# Altium PCB VHF_AMP.PCBDOC (part 7 of 7)
Units mm, origin at the board's own origin, x right, y up, seen from the top; angles counter-clockwise.
Board outline 222.47 x 100.01 mm, 4 copper layers (Top Layer, Int1 (GND), Int2 (PWR), Bottom Layer), stack 1.508 mm thick; 513 components, 284 nets, 1695 pads, 984 vias.
Unrouted connection lines stored in the file: 110.
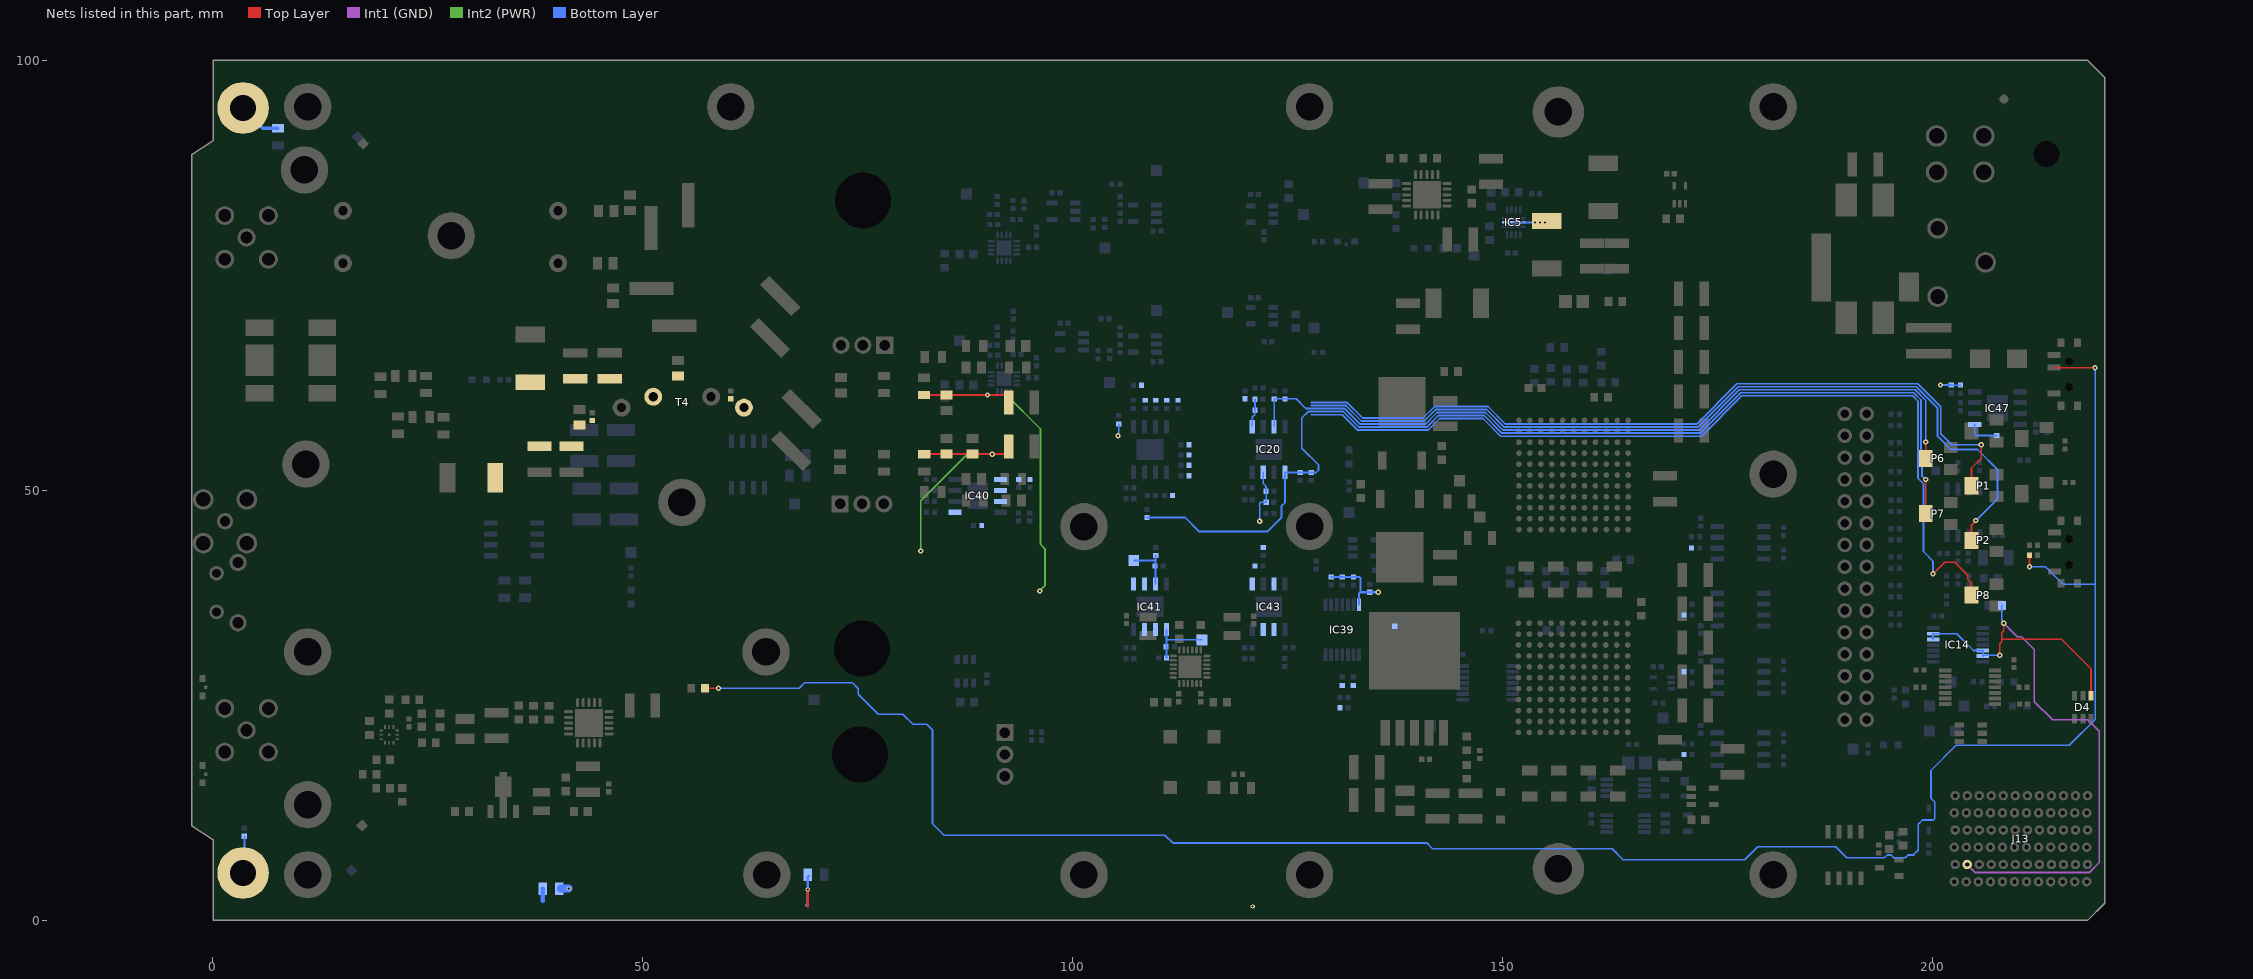
[diagram p7: the nets of this part, all layers, seen from the top]

## Via types
v1: diameter 0.6, hole 0.25, Top Layer to Bottom Layer, tented both sides, 878 vias
v2: diameter 0.6, hole 0.25, Top Layer to Bottom Layer, tented top, 61 vias
v3: diameter 0.5, hole 0.25, Top Layer to Bottom Layer, tented top, 27 vias
v4: diameter 1, hole 0.5, Top Layer to Bottom Layer, tented both sides, 16 vias
v5: diameter 0.5, hole 0.25, Top Layer to Bottom Layer, tented both sides, 2 vias

## Nets (pads, with @x,y where several pads share a name; then routed paths per layer and width w, separated by ;. In a path a pad name is that pad's centre, name@x,y a point inside that pad or via, vN(x,y) a via of type N, cw(c..) or ccw(c..) an arc to the next point about the centre after c; other vN are vias at no path point) (continued)
SERVMOD_3V3: D4.4 IC14.5 IC14.6 IC14.12 IC14.13 J13.K2 R85.2 | length 82.3
  Top Layer w0.2: v1(207.85,30.815) 207.85,32.149 208.1,32.399 208.1,32.678 ; v1(208.316,34.54) 208.316,33.663 208.1,33.447 208.1,32.678 ; D4.4@218.463,26.123 218.463,29.254 215.039,32.678 208.1,32.678
  Int1 (GND) w0.2: J13.K2@204.066,6.493 205.009,5.55 218.254,5.55 219.429,6.725 219.429,21.964 218.086,23.307 214.001,23.307 211.878,25.43 211.878,31.482 210.387,32.972 209.884,32.972 v1(208.316,34.54)
  Bottom Layer w0.2: IC14.12@200.095,32.67 200.187,32.67 200.095,32.762 IC14.13@200.095,33.32 202.854,33.32 204.804,31.37 IC14.5@205.895,31.37 IC14.6@205.895,30.815 ; IC14.6@205.895,30.72 205.99,30.815 v1(207.85,30.815) ; R85.2@208.12,36.603 208.1,36.583 208.1,34.864 208.316,34.648 v1(208.316,34.54)
SPI_MISO: R16.1
SPI_NCS1: R39.1
SPI_NCS2: R169.1
SPI_SCK: R37.1
STRIP1: C82.1 M1.1 M2.1 R25.1 R47.2 | length 8.3
  Bottom Layer w0.2: M2.1@3.75,5.65 C82.1@3.75,9.756
  Bottom Layer w0.4: M2.1@3.6,5.5 M2.1@3.75,5.65 ; M1.1@5.351,92.651 5.903,92.099 R25.1@7.65,92.099
  Bottom Layer w0.5: 38.45,2.25 R47.2@38.45,3.65 R47.2@38.45,3.7
STRIP2: R29.1 | length 5.4
  Top Layer w0.3: 69.25,1.634 v3(69.25,3.589)
  Bottom Layer w0.3: 69.107,1.769 69.25,1.912 v3(69.25,3.589) 69.25,5.05 R29.1@69.35,5.15
STRIP3: R47.1 | length 0.9
  Bottom Layer w0.9: R47.1@40.539,3.705 v5(41.459,3.705)
  other v5: 120.987,1.596
Sw_7V5: IC5.2 L9.1 | length 3.6
  Bottom Layer w0.2: IC5.2@151.33,81.147 v1(153.8,81.147) v1(154.41,81.147) v1(154.97,81.147)
SW_OFF: R1.1 R114.1 | length 246.3
  Top Layer w0.2: R114.1@57.31,26.981 v1(58.86,26.981) ; v2(211.323,41.118) R1.1@211.323,42.457 ; 214.183,64.252 v1(218.932,64.252)
  Bottom Layer w0.2: v1(58.86,26.981) 68.246,26.981 68.875,27.61 74.458,27.61 75.135,26.932 75.135,26.295 77.459,23.971 80.319,23.971 81.49,22.8 83.099,22.8 83.747,22.152 83.747,11.253 85.1,9.9 110.778,9.9 111.678,9 141.212,9 141.903,8.309 162.793,8.309 164.051,7.05 178.21,7.05 179.71,8.55 188.774,8.55 190.044,7.28 194.452,7.28 194.772,7.6 195.228,7.6 195.548,7.28 196.873,7.28 197.193,7.6 197.812,7.6 198.38,8.168 198.38,11.165 198.876,11.661 200.135,11.661 200.28,11.806 200.28,13.754 199.855,14.179 199.855,17.422 202.773,20.34 215.937,20.34 218.945,23.348 218.945,39.083 ; v2(211.323,41.118) 213.166,41.118 215.2,39.083 218.945,39.083 ; v1@218.945,64.252 218.945,39.083
Vbal_N: IC20.5 P7.2 R90.2 R190.2 R192.1 | length 123.5
  Top Layer w0.2: P7.2@199.25,47.3 199.252,47.302 v2(199.252,51.26)
  Bottom Layer w0.2: R90.2@108.7,46.83 113.128,46.83 114.758,45.2 122.7,45.2 124.327,46.827 124.327,48.138 124.75,48.56 IC20.5@124.75,52.105 124.785,52.07 R192.1@126.5,52.07 128.355,52.07 128.65,52.366 128.65,52.934 126.687,54.897 126.687,58.4 127.437,59.15 131.552,59.15 133.352,57.35 141.226,57.35 142.571,58.695 147.91,58.695 149.955,56.65 173.045,56.65 177.726,61.331 197.864,61.331 198.7,60.495 198.7,54.626 198.8,54.526 198.8,51.712 v2(199.252,51.26)
Vbal_P: IC20.3 P6.2 R81.2 R189.2 R191.1 | length 92.2
  Top Layer w0.2: P6.2@199.25,53.7 v2(199.25,55.621)
  Bottom Layer w0.2: v2(105.338,56.35) 105.4,56.412 R81.2@105.4,57.73 ; IC20.3@123.48,57.405 R191.1@123.48,60.63 R189.2@124.75,60.63 126.06,60.63 127.19,59.5 131.697,59.5 133.497,57.7 141.081,57.7 142.426,59.045 148.055,59.045 150.1,57 172.9,57 177.581,61.681 198.008,61.681 199.25,60.44 v2(199.25,55.621)
Vbalance_buf: IC41.6 IC41.7 R196.2 R202.2
Vbalance_inv: IC43.1 R203.1 R207.2
VBIAS_balance: IC41.5 P2.2 R209.2 R212.1 TP29.1 | length 106.7
  Top Layer w0.2: P2.2@204.562,44.17 204.562,45.966 204.58,45.983 v2(205.07,46.474)
  Bottom Layer w0.2: IC41.5@110.95,33.805 110.97,33.785 110.97,32.618 ; R212.1@110.97,30.5 110.97,32.618 ; TP29.1@115.1,32.618 110.97,32.618 ; 127.794,59.85 131.842,59.85 133.642,58.05 140.936,58.05 142.281,59.395 148.2,59.395 150.245,57.35 172.755,57.35 177.436,62.031 198.153,62.031 200.626,59.559 200.626,56.278 202.165,54.739 205.257,54.739 207.6,52.396 207.6,49.004 v2(205.07,46.474)
VBIAS_master: IC41.3 P1.2 R200.2 R204.1 TP27.1 | length 97.9
  Top Layer w0.2: P1.2@204.562,50.531 204.562,52.592 205.7,53.73 v2(205.7,55.289)
  Bottom Layer w0.2: TP27.1@107.155,41.841 109.68,41.841 ; IC41.3@109.68,39.105 109.68,41.841 ; R204.1@109.68,42.43 109.68,41.841 ; 127.794,60.2 131.987,60.2 133.787,58.4 140.791,58.4 142.136,59.745 148.345,59.745 150.39,57.7 172.61,57.7 177.292,62.381 198.298,62.381 200.976,59.704 200.976,56.564 202.251,55.289 v2(205.7,55.289)
Vbias_N: C41.2 C83.2 C84.2 C85.2 IC20.7 R21.1 R60.1 | length 33.5
  Top Layer w0.245: R21.1@82.8,54.2 C84.2@88.4,54.2 v1(90.7,54.2) 92.37,54.2 92.6,54.43 C85.2@92.6,55.1
  Int2 (PWR) w0.2: v1(82.389,42.93) 82.389,48.789 87.8,54.2 v1(90.7,54.2)
  Bottom Layer w0.2: v2(121.8,46.4) 121.8,48.483 121.917,48.6 C41.2@122.55,48.6 122.55,49.88 R60.1@122.53,49.9 122.53,50.476 122.21,50.797 IC20.7@122.21,52.105
Vbias_P: C40.2 C43.2 C44.2 C45.2 IC20.1 R14.1 R26.1 | length 41
  Top Layer w0.245: R14.1@82.76,61.096 C43.2@85.36,61.096 90.156,61.096 v1(90.16,61.1) 92.37,61.1 92.6,60.87 C45.2@92.6,60.2
  Int2 (PWR) w0.2: v1(90.16,61.1) 92.336,61.1 96.309,57.128 96.309,43.716 96.83,43.195 96.83,38.9 v1(96.23,38.3)
  Bottom Layer w0.2: IC20.1@120.94,57.405 120.94,58.49 121.23,58.78 R26.1@121.23,59.3 121.25,59.32 C40.2@121.25,60.6
VCC: C3.2 C7.2 IC39.14 R40.2 R41.1 R48.1 R91.2 R105.1 | length 8.7
  Bottom Layer w0.25: R40.2@130.107,39.915 R41.1@131.4,39.915 133.366,39.915 133.513,39.769 133.513,38.149 ; IC39.14@133.357,36.705 133.357,37.994 133.513,38.15 ; v2(135.584,38.15) C7.2@134.6,38.15 133.513,38.15
Vcmp_off: IC40.7 R185.1
Vcur_sum: IC40.1 IC40.6 R75.1
VDD_PA_N: C31.2 C46.2 C47.2 C48.2 L3.2 T4.2
VDD_PA_P: C50.2 C66.2 C70.2 C145.2 L2.2 T4.3
Vmaster_buf: IC41.1 IC41.2 R198.2 R208.2
VrefI2I: C51.2 IC43.3 IC43.6 IC43.7 R89.1 R194.2 R199.2 R205.2 R211.2 | length 2.3
  Bottom Layer w0.2: v2(200.973,62.25) C51.2@202.2,62.25 202.228,62.222 R89.1@203.297,62.222
Vtemperature_pull: IC47.1 R88.1 R94.2 R96.2 | length 3.8
  Bottom Layer w0.2: IC47.1@204.951,57.654 204.951,56.489 205.07,56.37 R88.1@207.514,56.37
Vtrh_off: IC40.5 P8.2 R193.2 R197.1 | length 103.4
  Top Layer w0.2: v2(200.095,40.3) 200.124,40.3 201.458,41.633 202.627,41.633 204.137,40.123 204.137,39.659 204.562,39.234 P8.2@204.562,37.81
  Bottom Layer w0.2: 127.794,58.8 131.407,58.8 133.207,57 141.371,57 142.716,58.345 147.765,58.345 149.81,56.3 173.19,56.3 177.871,60.981 197.719,60.981 198.339,60.361 198.339,51.395 198.979,50.755 198.979,42.881 200.095,41.765 v2(200.095,40.3)
pads on no net: B15.1 B18.1 B19.1 FTG1.FTG2 FTG2.1 FTG3.1 FTG4.1 FTG5.1 FTG6.1 IC1.1 IC6.4 IC6.5 IC6.8 IC6.9 IC6.11 IC6.12 IC7.9 IC7.22 IC9_VHF_FWD_RFD.2 IC9_VHF_FWD_RFD.6 IC9_VHF_FWD_RFD.8 IC9_VHF_FWD_RFD.13 IC9_VHF_REV_RFD.2 IC9_VHF_REV_RFD.6 IC9_VHF_REV_RFD.8 IC9_VHF_REV_RFD.13 IC16.5 IC21.G1 IC21.K2 IC21.L2 IC21.L3 IC22.G1 IC22.K2 IC22.L2 IC22.L3 IC25.4 IC25.5 IC25.8 IC25.9 IC25.11 IC25.12 IC28.1 IC28.3 IC29.1 IC33.4 IC36.4 IC37.4 IC38.1 IC39.6 IC39.8 IC39.9 IC39.12 IC44.8 IC44.9 IC44.10 IC44.11 IC47.5 J7.5 J13.A5 J13.B1 J13.B5 J13.B6 J13.C6 J13.D5 J13.E2 J13.E4 J13.E5 J13.F2 J13.F4 J13.G3 J13.H3 J13.H6 J13.I2 J13.I6 J13.J3 J13.K3 J13.K6 J13.L2 J13.L6 LD3.3 LD13_VHF_FWD_RFD.3 LD13_VHF_REV_RFD.3 PB1.4 PB1.H1 PB1.H2 PB2.2 PB2.4 PB2.H1 PB2.H2 PB3.3 PB3.4 R35.1 T2.4 T3.4
copper on no net: | length 121.2
  Int1 (GND) w0.2: -0.047,53.318 0.036,53.318
  Int2 (PWR) w0.15: 11.011,3.143 11.123,3.143 ; 100.64,97.14 119.38,97.14
  Int2 (PWR) w0.4: 156.599,73.96 159.526,73.96 159.615,74.05
  Bottom Layer w0.2: 101.477,97.393 105.884,97.393
  Bottom Layer w0.3: 124.249,3.263 125.045,3.263
  Bottom Layer w0.9: 0.071,88.732 4.246,92.908 ; 0.177,88.893 -1.235,87.481 -1.235,70.293 -1.235,12.628 2.624,8.769 2.624,6.525 ; 2.839,93.757 2.839,95.158 ; 2.908,93.757 3.6,94.45 4.4,93.65

## Polygon pours and split planes (outlines as drawn)
GND on Bottom Layer "BAL_BOT" (solid, pour order 99): 5.376,97.2 220.027,97.2 220.027,2.793 9.087,2.793 7.294,4.586 7.294,7.355 2.476,7.355 2.821,88.544 5.376,91.099
STRIP2 on Bottom Layer "esd1" (solid, pour order 105): 83.531,1 100.598,1 100.598,2.269 45.598,2.269 45.598,1
STRIP1 on Bottom Layer "esd1" (solid, pour order 107): 0.856,6.479 7.981,6.479 7.981,2.4 40.606,2.4 40.606,1.039 0.856,1.039
P12V0_SW on Bottom Layer "NONET_L01_P-001" (solid, pour order 83): 187.915,21.486 187.915,11 194.533,11 194.533,21.352
STRIP3 on Bottom Layer "STRIP3_L04_P101" (solid, pour order 101): 218.131,1 218.148,1 219.388,2.24 120.598,2.24 120.598,1
P48V0_P on Bottom Layer "NONET_L01_P-001" (solid, pour order 70): 45.9,44.5 45.9,48.1 40.5,48.1 40.5,41.945 45.9,41.945
P48V0_N on Bottom Layer "NONET_L01_P-001" (solid, pour order 3): 45.352,54.95 45.352,51.955 40.795,51.955 33.649,59.1 33.649,60.635 36.672,60.635 42.357,54.95
P3V3_MP on Bottom Layer "NONET_L01_P-001" (solid, pour order 5): 181.054,12.284 187.65,12.284 187.65,14.081 187.65,17.163 172.69,17.163 172.69,14.912 175.318,12.284 181.054,12.284
P3V3 on Bottom Layer "NONET_L01_P-001" (solid, pour order 18): 172.037,80.328 171.1,80.328 164.445,73.674 164.445,71.322 166.877,68.89 169,68.89 175.017,74.907 175.017,77.349
GND on Top Layer "gatga" (solid, pour order 100): 6.177,97.2 220.081,97.2 220.081,2.85 6.177,2.85 6.177,7.359 2.998,8.121 -2.4,11.871 -2.4,89 -0.054,90.466 6.177,91.159
STRIP3 on Top Layer "STRIP3_L01_P102" (solid, pour order 102): 218.131,1 218.148,1 219.388,2.24 120.598,2.24 120.598,1
P12V0 on Top Layer "NONET_L01_P-001" (solid, pour order 16): 218.823,7.303 218.823,3.243 202.577,3.243 197.19,8.63 188.615,8.63 188.345,8.9 188.345,11.859 188.985,12.499 198.498,12.499 203.694,7.303
no net on Top Layer "esd1" (solid, pour order 106): 0.823,7.025 7.948,7.025 7.948,2.3 40.573,2.3 40.573,1 0.823,1
STRIP2 on Top Layer "esd1" (solid, pour order 103): 83.531,1 100.598,1 100.598,2.269 45.598,2.269 45.598,1
P12V0_SW on Top Layer "NONET_L01_P-001" (solid, pour order 97): 172.8,8.63 172.8,16.003 171.053,16.003 169.813,14.763 169.813,8.63
P3V3_MP on Top Layer "NONET_L01_P-001" (solid, pour order 7): 173.6,12.84 173.8,12.64 177.84,12.64 178.6,13.4 178.6,17.995 174.559,17.995 173.6,17.036
NetC11_2 on Top Layer "NONET_L01_P-001" (solid, pour order 73): 49.833,26.459 49.833,23.459 46.184,19.809 44.793,19.809 44.793,23.359 47.343,23.359 47.343,26.459
NetC2_2 on Top Layer "NONET_L01_P-001" (solid, pour order 79): 42.843,19.559 42.043,19.559 41.471,20.132 27.793,20.132 27.793,22.075 42.843,22.075 42.843,21.184
P12V0_SW on Top Layer "NONET_L01_P-001" (solid, pour order 80): 30.893,25.314 30.893,22.514 27.793,22.514 27.793,25.314
P5V5 on Top Layer "NONET_L01_P-001" (solid, pour order 29): 164.65,73.88 164.65,77 158.46,77 158.46,80.5 165.3,80.5 165.3,84.772 157.03,84.772 157.03,79.247 152.2,79.247 152.2,73.88
P12V0_SW on Top Layer "NONET_L01_P-001" (solid, pour order 32): 152.5,23.7 158.9,23.7 158.9,21.47 160.67,19.7 164,19.7 164.58,19.12 164.58,16.7 151.5,16.7 150.7,17.5 150.7,24 151.7,25 152.5,25
P48V0_P on Top Layer "NONET_L01_P-001" (solid, pour order 31): 161.5,36.071 161.5,27.65 165.3,27.65 167.4,25.55 167.4,20.21 171.647,20.21 171.647,42.49 168.2,42.49 168.2,37.087 167.184,36.071
P48V0_N on Top Layer "NONET_L01_P-001" (solid, pour order 46): 161.5,51.1 171.292,51.1 171.292,74.695 167.6,74.695 167.6,70.462 161.5,64.362 161.5,57.6
VDD_PA_P on Top Layer "NONET_L01_P-001" (solid, pour order 8): 33.096,58.287 31.6,56.791 31.6,48.919 35.8,48.919 35.8,58.287
VDD_PA_N on Top Layer "NONET_L01_P-001" (solid, pour order 81): 63.2,58.6 61.7,57.1 58.9,57.1 54.987,57.1 50.797,61.29 32.731,61.29 32.731,63.971 54.829,63.971 57.916,60.884 62.516,60.884 63.2,60.2
VDD_PA_P on Top Layer "NONET_L01_P-001" (solid, pour order 82): 53.2,57.168 50.232,54.2 33.096,54.2 33.096,58.287 48.866,58.287 49.232,58.654 49.232,61.332 50.1,62.2 52.4,62.2 53.2,61.4
P12V0_SW on Top Layer "NONET_L01_P-001" (solid, pour order 52): 192,72.293 192,64.353 195.65,64.353 200.103,59.9 204.4,59.9 207.766,63.266 207.766,67.3 197.505,67.3 196.5,68.305 196.5,72.293
NetC26_2 on Top Layer "NONET_L01_P-001" (solid, pour order 28): 141.832,89.9 141.832,87.755 142.238,87.349 142.238,85.248 145.9,85.248 145.9,86.048 146.109,86.257 163.612,86.257 163.612,89.9
P12V0 on Top Layer "NONET_L01_P-001" (solid, pour order 25): 143.582,76.563 143.582,69.845 141.232,69.845 140.477,70.6 137.452,70.6 137.452,74.894 137.452,76.563
P12V0 on Top Layer "NONET_L01_P-001" (solid, pour order 10): 194.26,28.25 194.26,25.246 191.436,25.246 191.436,20.78 194.26,20.78 194.26,11.227 187.32,11.227 187.32,28.25
P5V0A on Top Layer "NONET_L01_P-001" (solid, pour order 68): 134.732,85.014 136.972,85.014 137.932,84.054 139.532,84.054 139.532,86.164 140.232,86.164 140.232,87.704 134.732,87.704
P12V0_SW on Top Layer "NONET_L01_P-001" (solid, pour order 11): 186.845,7.05 186.845,3.533 192.502,3.533 192.502,7.05
P3V3_MP on Top Layer "NONET_L01_P-001" (solid, pour order 13): 194.191,20.8 196.827,23.436 196.827,27.797 198.13,29.1 201.012,29.1 202.93,31.017 202.93,33.913 199.694,33.913 192.881,27.1 191.2,27.1 191.2,20.8
P12V0_SW on Top Layer "NONET_L01_P-001" (solid, pour order 17): 136.7,13.5 136.7,9.3 140.4,9.3 140.4,13.5
P12V0F on Top Layer "NONET_L01_P-001" (solid, pour order 27): 149.125,69.324 149.125,81.149 148.55,81.724 145.833,81.724 145.432,81.322 145.432,70.367 146.475,69.324
NetC15_2 on Top Layer "NONET_L01_P-001" (solid, pour order 57): 140.65,25 140.65,20.05 141.1,19.6 141.1,14.1 150.7,14.1 150.7,17 145,17 143.2,18.8 143.2,25
NetC13_2 on Top Layer "NONET_L01_P-001" (solid, pour order 53): 135.75,25 135.75,20.15 134.7,19.1 134.7,12.8 135.5,12 136.1,12 136.7,12.6 136.7,13.3 137.3,13.9 139.7,13.9 140.1,14.3 140.1,16.7 139,17.8 139,25
NetC79_1 on Top Layer "NONET_L01_P-001" (solid, pour order 51): 204,94.9 204,86.013 198.487,80.5 191.6,80.5 191.6,89.1 188.4,89.1 188.4,81 191,78.4 201,78.4 204.9,74.5 207.7,74.5 208.2,75 208.2,91.7 205,94.9
NetC79_2 on Top Layer "NONET_L01_P-001" (solid, pour order 50): 202.636,93.8 202.636,86.631 197.822,81.817 192.848,81.817 192.848,89.058 197.59,93.8
P12V0_SW on Top Layer "NONET_L01_P-001" (solid, pour order 33): 152.5,47.3 158.9,47.3 158.9,45.07 160.67,43.3 164,43.3 164.58,42.72 164.58,40.3 151.5,40.3 150.7,41.1 150.7,47.6 151.7,48.6 152.5,48.6
no net on Int1 (GND) "BAL_TOP" (solid, pour order 108): 4.648,97.343 218.552,97.343 218.552,2.851 4.648,2.851 4.648,7.826 3.027,8.121 -1.723,11.3 -1.723,78.376 0.764,80.863 0.764,91.626 4.648,91.626
STRIP3 on Int1 (GND) "NONET_L01_P-001" (solid, pour order 12): 39.764,0.052 39.764,3.974 40.636,4.845 41.896,4.845 42.764,3.977 42.764,3.127 43.264,2.627 121.537,2.627 122.037,2.127 122.037,0.799 121.289,0.052
P3V3 on Int1 (GND) "NONET_L01_P-001" (solid, pour order 36): 170.55,27.2 170.55,7.99 179.018,7.99 179.018,27.201
P3V3_MP on Int1 (GND) "NONET_L01_P-001" (solid, pour order 67): 194.6,24.928 194.6,10.008 185.68,10.008 185.68,24.928
NetC79_2 on Int1 (GND) "NONET_L01_P-001" (solid, pour order 104): 201.8,70.2 203.5,71.9 203.5,92 201.4,94.1 199.7,94.1 197.601,92.001 197.601,72.399 199.8,70.2 200.3,70.2
no net on Int2 (PWR) "BAL_TOP" (solid, pour order 98): 4.877,97.432 218.781,97.432 218.781,2.568 4.877,2.568 4.877,7.359 3.826,7.588 -1.494,11.108 -1.494,77.909 0.993,80.396 0.993,91.159 4.877,91.159
P3V3_MP on Int2 (PWR) "NONET_L01_P-001" (solid, pour order 61): 178.811,35.28 158.81,15.28 158.81,11.922 178.014,11.922 178.807,12.715
P3V3 on Int2 (PWR) "NONET_L01_P-001" (solid, pour order 58): 170.919,19.918 177.204,19.918 178.938,21.652 178.938,55.107 170.05,63.995 170.05,70.017 170.038,70.017 166.289,73.765 164.534,73.765 163.3,72.531 163.3,59 161.758,57.458 161.758,56.542 163.1,55.2 174.545,55.2 175.6,54.145 175.6,50.524 170.919,45.843 170.919,29.699
P3V3 on Int2 (PWR) "NONET_L01_P-001" (solid, pour order 40): 171.729,25.618 167.164,30.183 167.164,30.361 172.658,35.855 172.658,26.548
P3V3 on Int2 (PWR) "NONET_L01_P-001" (solid, pour order 65): 104.487,19.059 104.487,15.737 63.018,15.737 52.79,25.965 31.822,25.965 27.986,29.8 26.438,29.8 24.6,27.962 24.6,9.033 188.649,9.033 188.649,5.3 19.41,5.3 19.41,28.79 23.711,33.091 50.148,33.091 64.18,19.059
P12V0_SW on Int2 (PWR) "NONET_L01_P-001" (solid, pour order 89): 25,25.85 25,9.1 194.8,9.1 194.8,18.1 184.149,18.1 177.849,11.8 32.5,11.8 30.7,13.6 30.7,25.85
NetC11_2 on Int2 (PWR) "NONET_L01_P-001" (solid, pour order 94): 52.723,10.033 34.95,10.033 34.95,25.832 52.723,25.832
P3V3 on Int2 (PWR) "NONET_L01_P-001" (solid, pour order 59): 202.488,46.968 202.488,27.187 208.372,21.303 220.039,21.303 220.039,46.968
P3V3 on Int2 (PWR) "NONET_L01_P-001" (solid, pour order 72): 201,46.576 220.039,46.576 220.039,57.995 201,57.995
P3V3A on Int2 (PWR) "NONET_L01_P-001" (solid, pour order 77): 89.161,60.4 127.828,60.4 127.828,87.6 89.161,87.6
P12V0 on Int2 (PWR) "NONET_L01_P-001" (solid, pour order 78): 150.49,53.91 161.32,53.91 161.32,57.02 162.197,57.897 176.377,57.897 178.598,55.677 178.598,9.962 179.02,9.54 181.898,9.54 185.122,12.764 185.122,42.619 199.458,56.956 204.672,56.956 209.2,61.483 209.2,65 204.9,69.3 179.5,69.3 164.903,83.897 129.3,83.897 129.3,75.1 130.3,74.1
P48V0_P on Int2 (PWR) "NONET_L01_P-001" (solid, pour order 90): 170.812,25.812 156.4,11.4 140.147,11.4 128.047,23.5 61.274,23.5 42.49,42.285 42.49,44.1 47.329,44.1 56.229,35.2 59.682,35.2 65.068,29.814 130.866,29.814 143.98,16.7 153.586,16.7 164.77,27.883 164.77,38.939 170.812,38.939
P48V0_N on Int2 (PWR) "NONET_L01_P-001" (solid, pour order 71): 33.419,49.6 41.251,49.6 59.498,49.6 66.168,42.93 66.168,42.353 71.656,36.864 81.039,36.864 83.407,34.496 89.425,34.496 92.2,31.72 101.303,31.72 103.883,34.3 140.252,34.3 143.65,37.698 143.65,39.145 137.147,39.145 82.655,39.145 69.566,52.234 33.419,52.234
P48V0_N on Int2 (PWR) "NONET_L01_P-001" (solid, pour order 35): 140.287,34.29 146.681,27.896 146.681,15.409 154.523,15.409 164.77,25.655 164.77,52.06 171.45,52.06 171.45,55.19 160.84,55.19 160.84,25.576 155.059,19.795 150.919,19.795 150.919,39.145 140.252,39.145 140.252,34.3
P3V3A on Int2 (PWR) "NONET_L01_P-001" (solid, pour order 76): 122.306,72.9 125.5,72.9 143.65,54.75 143.65,39.89 142.16,38.4 132.566,38.4 122.306,48.66
NetC15_2 on Int2 (PWR) "NONET_L01_P-001" (solid, pour order 66): 144.811,15.8 141.603,15.8 141.603,19.007 130.436,30.174 102.891,30.174 102.891,33.37 135.115,33.37 144.811,23.674 144.811,17.519
P3V3 on Int2 (PWR) "NONET_L01_P-001" (solid, pour order 64): 82.389,82.174 84.618,79.944 87.56,79.944 89.161,81.545 89.161,87.762 129.048,87.762 161.178,87.762 179.641,69.3 205.062,69.3 206.184,68.178 206.184,56.403 220.039,56.403 220.039,82.6 191.7,82.6 183.5,90.8 171,90.8 167.9,93.9 83.465,93.9 82.389,92.824
P3V3_MP on Int2 (PWR) "NONET_L01_P-001" (solid, pour order 49): 211.56,25.475 206.586,25.475 204.605,27.456 204.605,54.95 201.981,54.95 201.981,27.236 207.139,22.078 212.149,22.078 212.149,24.886
P3V3 on Int2 (PWR) "NONET_L01_P-001" (solid, pour order 48): 139.665,57.912 138.31,56.557 136.651,56.557 123.356,69.852 123.356,90.65 126.371,90.65 126.371,74.58 139.665,61.286
P5V5 on Int2 (PWR) "NONET_L01_P-001" (solid, pour order 69): 145.5,52.8 149.604,52.8 158.5,61.696 158.5,78.338 157.838,79 149.671,79 148.182,77.51 148.182,68.23 145.5,65.548
P12V0_SW on Int2 (PWR) "NONET_L01_P-001" (solid, pour order 44): 160.75,57.014 160.75,25.735 154.71,19.695 150.25,19.695 150.25,55.025 152.15,56.925
P48V0_N on Int2 (PWR) "NONET_L01_P-001" (solid, pour order 38): 33.801,61.036 37.215,61.036 46.403,51.848 46.403,51.181 45.736,51.848 33.4,51.848 33.4,60.635
P3V3_MP on Int2 (PWR) "NONET_L01_P-001" (solid, pour order 56): 216.33,30.851 216.33,28.421 213.383,25.474 213.382,25.475 211.56,25.475 211.171,25.086 211.171,23.056 212.149,22.078 212.67,22.078 213.361,21.387 213.361,21.209 213.45,21.12 218.901,21.12 219.301,21.52 219.301,30.07 218.556,30.815 217.485,30.815
P3V3 on Int2 (PWR) "NONET_L01_P-001" (solid, pour order 42): 19.926,28.275 13.601,34.6 -2.489,34.6 -2.489,37.8 19.002,37.8 24.226,32.576
P12V0_SW on Int2 (PWR) "NONET_L01_P-001" (solid, pour order 43): 185.986,10.123 185.986,3.086 193.345,3.086 193.345,10.082

## Keep-outs
Top Layer:
  lines w0.254: 129.6,97 179.6,97 ; 183.4,97 219.8,97.053
Bottom Layer:
  lines w0.254: 6.35,4.7 6.35,4.775 ; 129.505,97.053 179.6,97.1 ; 183.3,97.1 219.8,97.1
KeepOutLayer:
  circle w0.05: c156.527,5.993 r3.223
  circle w0.05: c156.527,93.993 r3.223
  lines w0.2: -1.912,11.275 -1.912,88.468 0.027,89.818 ; 0.593,92.003 0.593,92.893 ; 0.593,96.109 0.593,97.432 ; 0.598,7.15 0.598,9.225 ; 0.6,97.45 1.847,97.45 ; 5.809,97.45 26.766,97.45 ; 8.273,2.575 37.898,2.575 ; 35.145,97.45 99.888,97.45 ; 43.552,2.575 68.527,2.575 ; 69.973,2.575 164.598,2.575 170.773,2.575 212.248,2.575 ; 107.252,97.45 168.423,97.45 220.086,97.45 220.637,96.899 220.637,2.55 212.248,2.55 ; 211.677,2.543 220.066,2.543

## Other copper
Top Layer:
  pour cut-out: 9.25,11.236 -6.7,11.236 -6.7,0 9.044,0
  pour cut-out: 9.1,89.1 9.1,100 -7.3,100 -7.3,89.1

## Silkscreen, mask and mechanical layers (free items; w line width, h text height)
Top Overlay:
  drawing of 1185 lines, arcs and shapes, not listed
  text "P12V0" at 214.9,94.8 h1
  text "RF OUT" at 0.336,83.695 h1.52
  text "P12V0" at 214.9,82.6 h1
  text "ON" at 219.401,65.5 h1.52 r90
  text "EEM 1" at 171.756,60.743 h1.52
  text "FAN" at 207.442,58.88 h1 r90
  text "EEM" at 219.4,58.8 h1.52 r90
  text "RF SW" at 213.297,57.19 h1
  text "VHF AMP v2.0" at 103.6,52.675 h1.5
  text "WUT ISE 2025" at 107.742,49.996 h1.02
  text "EEM" at 219.4,44.4 h1.52 r90
  text "0...2V5" at 6.541,44.3 h1.52 r90
  text "GAIN TUNE" at 8.2,41.6 h1 r90
  text "ON" at 219.418,38.233 h1.52 r90
  text "RF SW" at 213.442,36.431 h1
  text "RESET" at 6.54,35.616 h1 r90
  text "RF IN" at 0.336,26.779 h1.52
  text "EEM" at 187.9,16.3 h1.52
Bottom Overlay:
  drawing of 1027 lines, arcs and shapes, not listed
  text "REV OP" at 129.814,86.75 h1 r90
  text "P5V0" at 136.796,86.2 h1 r90
  text "VHF AMP v1.0" at 60.27,81.642 h1.5
  text "WUT ISE 2023" at 56.5,78.748 h1.02
  text "RF DIS" at 166.9,76.871 h1
  text "P5V5" at 147.68,73.96 h1
  text "RF OFF" at 117.345,72.324 h1
  text "FWD RMS PW" at 109.627,70.4 h1
  text "FWD OP" at 135.832,68.66 h1
  text "P48V0" at 174.349,58.145 h1
  text "P3V3A" at 136.2,44.633 h1
  text "P48V0" at 62.6,40.9 h1
  text "ISENSE N" at 89.26,36.3 h1
  text "P12V0" at 196.33,32.9 h1 r90
  text "P3V3" at 200.635,28.119 h1
  text "DET RMS FWD" at 91.3,27.2 h1 r270
  text "DET RMS REV" at 93.1,27.2 h1 r270
  text "ISENSE P" at 68.8,25.4 h1
  text "DET RST" at 167.3,22.9 h1
  text "VBIA P DAC" at 71.3,22.1 h1
  text "P3V3MP" at 210.67,21.2 h1
  text "FINE TUNE" at 139.5,21 h1
  text "RF DIS" at 167.354,20.978 h1
  text "PS ON BP" at 219.1,19.9 h1
  text "GND" at 198.633,19.25 h1 r90
  text "P12V0SW" at 195.8,18.97 h1 r90
  text "REV TRH" at 97.1,13.4 h1
  text "FWD TRH" at 97.1,11.8 h1
  text "VBIA P DAC" at 71.267,9 h1
Top Solder:
  rectangle: 1.221,0.602 3.398,2.4
  rectangle: 3.398,0.602 5.575,2.375
  rectangle: 5.048,0.602 220.017,2.4
  region: 1.2,53 -2.65,53 -2.65,74 1.2,74
  region: 183.5,7.25 183.5,3.5 9.1,3.5 9.1,7.25
  region: 183.5,3.4 179.8,3.4 179.8,96.1 183.5,96.1
  region: 129.5,3.2 125.8,3.2 125.8,96.2 129.5,96.2
  region: 99.7,47.2 103.4,47.2 103.4,4.8 99.7,4.8
  region: 9.1,92.85 9.1,96.55 183.5,96.55 183.5,92.85
  region: 101.6,43.9 101.6,47.6 129.2,47.6 129.2,43.9
  region: 12.85,5.6 9.15,5.6 9.15,13.39 12.85,13.39
  region: 12.8,89.15 12.8,85.45 -2.64,85.45 -2.64,89.15
  region: 12.82,54.8 12.82,51.1 -2.62,51.1 -2.62,54.8
  region: 13.897,33 13.897,29.3 -2.497,29.3 -2.497,33
  region: 63,31 66.7,31 66.7,5.2 63,5.2
  region: 66.7,32.9 66.7,29.2 11.33,29.2 11.33,32.9
  region: 12.85,15 12.85,11.3 -2.525,11.3 -2.525,15
  region: 12.85,73 9.15,73 9.15,96.1 12.85,96.1
  region: 12.75,6.9 9.05,6.9 9.05,53.4 12.75,53.4
Bottom Solder:
  rectangle: 3.398,0.602 5.575,2.375
  rectangle: 1.221,0.602 3.398,2.4
  rectangle: 4.967,0.602 220.017,2.4
Mechanical1:
  lines w0.05: 218.066,-0.007 220.066,1.993 220.066,2.016 220.066,97.993 218.066,99.993 ; 218.066,0 0.1,0 0.1,9.35 -2.4,11 -2.4,89 0.1,90.65 0.1,99.972 0.128,100 218.066,100
  lines w0.1: 1.027,22.743 1.027,24.243 ; 1.027,39.493 1.027,40.993 ; 1.027,51.743 1.027,53.243 ; 1.027,59.743 1.027,61.243 ; 1.027,76.493 1.027,77.993 ; 1.027,88.743 1.027,90.243
Mechanical2:
  lines w0.1: -2.517,-14.245 -2.517,108.437
Mechanical3:
  lines w0.1: -5.017,-14.245 -5.017,110.787 ; -2.517,-14.245 -2.517,111.06
Mechanical4:
  lines w0.1: -2.6,-14.238 -2.6,117.232
  lines w0.15: -5.044,-14.194 -5.044,114.162
  lines w0.2: 2.288,5.512 3.556,5.512 ; 3.545,7.074 3.556,7.063 3.556,5.512 ; 3.556,4.163 3.556,5.512 ; 5.412,5.512 3.556,5.512
Mechanical13:
  lines w0.01: -3.323,-0.791 -3.323,80.917
DrillDrawing:
  drawing of 540 lines, arcs and shapes, not listed
  text "Symbol" at 18.076,244.103 h1.83
  text "Count" at 30.926,244.103 h1.83
  text "Hole Size" at 47.177,244.103 h1.83
  text "Plated" at 76.379,244.103 h1.83
  text "Hole Type" at 89.228,244.103 h1.83
  text "Drill Layer Pair" at 107.867,244.103 h1.83
  text "Via/Pad" at 145.955,244.103 h1.83
  text "Pad Shape" at 160.937,244.103 h1.83
  text "Template" at 179.881,244.103 h1.83
  text "Description" at 203.496,244.103 h1.83
  text "Hole Tolerance (+)" at 225.182,244.103 h1.83
  text "Hole Tolerance (-)" at 259.055,244.103 h1.83
  text "1" at 30.926,240.293 h1.52
  text "3.000mm (118.11mil)" at 47.177,240.293 h1.52
  text "NPTH" at 76.379,240.293 h1.52
  text "Round" at 89.228,240.293 h1.52
  text "Top Layer - Bottom Layer" at 107.867,240.293 h1.52
  text "Pad" at 145.955,240.293 h1.52
  text "Rounded" at 160.937,240.293 h1.52
  text "c100hn300m300" at 179.881,240.293 h1.52
  text "2" at 30.926,236.483 h1.52
  text "1.300mm (51.18mil)" at 47.177,236.483 h1.52
  text "PTH" at 76.379,236.483 h1.52
  text "Round" at 89.228,236.483 h1.52
  text "Top Layer - Bottom Layer" at 107.867,236.483 h1.52
  text "Pad" at 145.955,236.483 h1.52
  text "Rounded" at 160.937,236.483 h1.52
  text "c200h130" at 179.881,236.483 h1.52
  text "2" at 30.926,232.673 h1.52
  text "1.400mm (55.12mil)" at 47.177,232.673 h1.52
  text "PTH" at 76.379,232.673 h1.52
  text "Round" at 89.228,232.673 h1.52
  text "Top Layer - Bottom Layer" at 107.867,232.673 h1.52
  text "Pad" at 145.955,232.673 h1.52
  text "Rounded" at 160.937,232.673 h1.52
  text "c210h140" at 179.881,232.673 h1.52
  text "2" at 30.926,228.863 h1.52
  text "3.000mm (118.11mil)" at 47.177,228.863 h1.52
  text "PTH" at 76.379,228.863 h1.52
  text "Round" at 89.228,228.863 h1.52
  text "Top Layer - Bottom Layer" at 107.867,228.863 h1.52
  text "Pad" at 145.955,228.863 h1.52
  text "Rounded" at 160.937,228.863 h1.52
  text "c600h300" at 179.881,228.863 h1.52
  text "D" at 17.338,228.61 h1.69
  text "3" at 30.926,225.053 h1.52
  text "6.500mm (255.91mil)" at 47.177,225.053 h1.52
  text "NPTH" at 76.379,225.053 h1.52
  text "Round" at 89.228,225.053 h1.52
  text "Top Layer - Bottom Layer" at 107.867,225.053 h1.52
  text "Pad" at 145.955,225.053 h1.52
  text "Rounded" at 160.937,225.053 h1.52
  text "c150hn650m650" at 179.881,225.053 h1.52
  text "4" at 30.926,221.243 h1.52
  text "0.900mm (35.43mil)" at 47.177,221.243 h1.52
  text "NPTH" at 76.379,221.243 h1.52
  text "Round" at 89.228,221.243 h1.52
  text "Top Layer - Bottom Layer" at 107.867,221.243 h1.52
  text "Pad" at 145.955,221.243 h1.52
  text "Rounded" at 160.937,221.243 h1.52
  text "c50hn90m90" at 179.881,221.243 h1.52
  text "C" at 17.338,220.99 h1.69
  text "4" at 30.926,217.433 h1.52
  text "1.800mm (70.87mil)" at 47.177,217.433 h1.52
  text "PTH" at 76.379,217.433 h1.52
  text "Round" at 89.228,217.433 h1.52
  text "Top Layer - Bottom Layer" at 107.867,217.433 h1.52
  text "Pad" at 145.955,217.433 h1.52
  text "Rounded" at 160.937,217.433 h1.52
  text "c250h180" at 179.881,217.433 h1.52
  text "7" at 30.926,213.623 h1.52
  text "1.700mm (66.93mil)" at 47.177,213.623 h1.52
  text "PTH" at 76.379,213.623 h1.52
  text "Round" at 89.228,213.623 h1.52
  text "Top Layer - Bottom Layer" at 107.867,213.623 h1.52
  text "Pad" at 145.955,213.623 h1.52
  text "Rounded" at 160.937,213.623 h1.52
  text "c240h170" at 179.881,213.623 h1.52
  text "8" at 30.926,209.813 h1.52
  text "1.067mm (42.00mil)" at 47.177,209.813 h1.52
  text "PTH" at 76.379,209.813 h1.52
  text "Round" at 89.228,209.813 h1.52
  text "Top Layer - Bottom Layer" at 107.867,209.813 h1.52
  text "Pad" at 145.955,209.813 h1.52
  text "Rounded" at 160.937,209.813 h1.52
  text "c208h107" at 179.881,209.813 h1.52
  text "8" at 30.926,206.003 h1.52
  text "1.500mm (59.06mil)" at 47.177,206.003 h1.52
  text "PTH" at 76.379,206.003 h1.52
  text "Round" at 89.228,206.003 h1.52
  text "Top Layer - Bottom Layer" at 107.867,206.003 h1.52
  text "Pad" at 145.955,206.003 h1.52
  text "Rounded" at 160.937,206.003 h1.52
  text "c220h150" at 179.881,206.003 h1.52
  text "10" at 30.926,202.193 h1.52
  text "1.200mm (47.24mil)" at 47.177,202.193 h1.52
  text "PTH" at 76.379,202.193 h1.52
  text "Round" at 89.228,202.193 h1.52
  text "Top Layer - Bottom Layer" at 107.867,202.193 h1.52
  text "Pad" at 145.955,202.193 h1.52
  text "(Mixed)" at 160.937,202.193 h1.52
  text "(Mixed)" at 179.881,202.193 h1.52
  text "16" at 30.926,198.383 h1.52
  text "0.500mm (19.69mil)" at 47.177,198.383 h1.52
  text "PTH" at 76.379,198.383 h1.52
  text "Round" at 89.228,198.383 h1.52
  text "Top Layer - Bottom Layer" at 107.867,198.383 h1.52
  text "Via" at 145.955,198.383 h1.52
  text "Rounded" at 160.937,198.383 h1.52
  text "v100h50m0mx0" at 179.881,198.383 h1.52
  text "A" at 17.338,198.13 h1.69
  text "21" at 30.926,194.573 h1.52
  text "3.200mm (125.98mil)" at 47.177,194.573 h1.52
  text "PTH" at 76.379,194.573 h1.52
  text "Round" at 89.228,194.573 h1.52
  text "Top Layer - Bottom Layer" at 107.867,194.573 h1.52
  text "Pad" at 145.955,194.573 h1.52
  text "Rounded" at 160.937,194.573 h1.52
  text "(Mixed)" at 179.881,194.573 h1.52
  text "32" at 30.926,190.763 h1.52
  text "1.000mm (39.37mil)" at 47.177,190.763 h1.52
  text "PTH" at 76.379,190.763 h1.52
  text "Round" at 89.228,190.763 h1.52
  text "Top Layer - Bottom Layer" at 107.867,190.763 h1.52
  text "Pad" at 145.955,190.763 h1.52
  text "Rounded" at 160.937,190.763 h1.52
  text "c170h100" at 179.881,190.763 h1.52
  text "72" at 30.926,186.953 h1.52
  text "0.500mm (19.69mil)" at 47.177,186.953 h1.52
  text "PTH" at 76.379,186.953 h1.52
  text "Round" at 89.228,186.953 h1.52
  text "Top Layer - Bottom Layer" at 107.867,186.953 h1.52
  text "Pad" at 145.955,186.953 h1.52
  text "Rounded" at 160.937,186.953 h1.52
  text "c110h50(Tol5-5)" at 179.881,186.953 h1.52
  text "0.050mm (1.97mil)" at 225.182,186.953 h1.52
  text "0.050mm (1.97mil)" at 259.055,186.953 h1.52
  text "967" at 30.926,183.143 h1.52
  text "0.250mm (9.84mil)" at 47.177,183.143 h1.52
  text "PTH" at 76.379,183.143 h1.52
  text "Round" at 89.228,183.143 h1.52
  text "Top Layer - Bottom Layer" at 107.867,183.143 h1.52
  text "Via" at 145.955,183.143 h1.52
  text "Rounded" at 160.937,183.143 h1.52
  text "(Mixed)" at 179.881,183.143 h1.52
  text "1159 Total" at 30.926,179.333 h1.52
  text "Layer" at 18.524,169.346 h1.52
  text "Name" at 28.936,169.346 h1.52
  text "Material" at 62.708,169.346 h1.52
  text "Thickness" at 77.944,169.346 h1.52
  text "Constant" at 94.45,169.346 h1.52
  text "Board Layer Stack" at 108.924,169.346 h1.52
  text "Top Overlay" at 28.936,166.298 h1.52
  text "Top Solder" at 28.936,163.25 h1.52
  text "SM-001" at 62.708,163.25 h1.52
  text "0.025mm" at 77.944,163.25 h1.52
  text "4" at 94.45,163.25 h1.52
  text "Top Surface Finish" at 28.936,160.202 h1.52
  text "PbSn" at 62.708,160.202 h1.52
  text "0.022mm" at 77.944,160.202 h1.52
  text "1" at 18.524,157.154 h1.52
  text "Top Layer" at 28.936,157.154 h1.52
  text "CF-004" at 62.708,157.154 h1.52
  text "0.018mm" at 77.944,157.154 h1.52
  text "Dielectric 1" at 28.936,154.106 h1.52
  text "PP-017" at 62.708,154.106 h1.52
  text "0.068mm" at 77.944,154.106 h1.52
  text "4.3" at 94.45,154.106 h1.52
  text "Dielectric 2" at 28.936,151.058 h1.52
  text "PP-017" at 62.708,151.058 h1.52
  text "0.068mm" at 77.944,151.058 h1.52
  text "4.3" at 94.45,151.058 h1.52
  text "2" at 18.524,148.01 h1.52
  text "Int1 (GND)" at 28.936,148.01 h1.52
  text "CF-004" at 62.708,148.01 h1.52
  text "0.035mm" at 77.944,148.01 h1.52
  text "Dielectric 3" at 28.936,144.962 h1.52
  text "Core-039" at 62.708,144.962 h1.52
  text "1.130mm" at 77.944,144.962 h1.52
  text "4.6" at 94.45,144.962 h1.52
  text "3" at 18.524,141.914 h1.52
  text "Int2 (PWR)" at 28.936,141.914 h1.52
  text "CF-004" at 62.708,141.914 h1.52
  text "0.035mm" at 77.944,141.914 h1.52
  text "Dielectric 4" at 28.936,138.866 h1.52
  text "PP-017" at 62.708,138.866 h1.52
  text "0.068mm" at 77.944,138.866 h1.52
  text "4.3" at 94.45,138.866 h1.52
  text "Dielectric 5" at 28.936,135.818 h1.52
  text "PP-017" at 62.708,135.818 h1.52
  text "0.068mm" at 77.944,135.818 h1.52
  text "4.3" at 94.45,135.818 h1.52
  text "4" at 18.524,132.77 h1.52
  text "Bottom Layer" at 28.936,132.77 h1.52
  text "CF-004" at 62.708,132.77 h1.52
  text "0.018mm" at 77.944,132.77 h1.52
  text "Bottom Surface Finish" at 28.936,129.722 h1.52
  text "PbSn" at 62.708,129.722 h1.52
  text "0.022mm" at 77.944,129.722 h1.52
  text "Bottom Solder" at 28.936,126.674 h1.52
  text "SM-001" at 62.708,126.674 h1.52
  text "0.025mm" at 77.944,126.674 h1.52
  text "4" at 94.45,126.674 h1.52
  text "Bottom Overlay" at 28.936,123.626 h1.52

## Text inside footprints (layer, text, board x,y; h text height)
IC21: Mechanical14 "9" at 166.077,24.452 h0.4 r270; Mechanical14 "1" at 166.077,34.612 h0.4 r270; Mechanical14 "2" at 166.077,33.342 h0.4 r270; Mechanical14 "3" at 166.077,32.072 h0.4 r270; Mechanical14 "4" at 166.077,30.802 h0.4 r270; Mechanical14 "5" at 166.077,29.532 h0.4 r270; Mechanical14 "6" at 166.077,28.262 h0.4 r270; Mechanical14 "7" at 166.077,26.992 h0.4 r270; Mechanical14 "8" at 166.077,25.722 h0.4 r270; Mechanical14 "10" at 166.077,23.182 h0.4 r270; Mechanical14 "11" at 166.077,21.912 h0.4 r270; Mechanical14 "F" at 158.038,36.301 h0.4 r270; Mechanical14 "E" at 159.308,36.301 h0.4 r270; Mechanical14 "D" at 160.578,36.301 h0.4 r270; Mechanical14 "G" at 156.768,36.301 h0.4 r270; Mechanical14 "C" at 161.848,36.301 h0.4 r270; Mechanical14 "B" at 163.118,36.301 h0.4 r270; Mechanical14 "A" at 164.388,36.301 h0.4 r270; Mechanical14 "H" at 155.498,36.301 h0.4 r270; Mechanical14 "I" at 154.228,36.226 h0.4 r270; Mechanical14 "J" at 152.933,36.355 h0.4 r270; Mechanical14 "K" at 151.663,36.355 h0.4 r270
IC22: Mechanical14 "9" at 166.147,48.032 h0.4 r270; Mechanical14 "1" at 166.147,58.192 h0.4 r270; Mechanical14 "2" at 166.147,56.922 h0.4 r270; Mechanical14 "3" at 166.147,55.652 h0.4 r270; Mechanical14 "4" at 166.147,54.382 h0.4 r270; Mechanical14 "5" at 166.147,53.112 h0.4 r270; Mechanical14 "6" at 166.147,51.842 h0.4 r270; Mechanical14 "7" at 166.147,50.572 h0.4 r270; Mechanical14 "8" at 166.147,49.302 h0.4 r270; Mechanical14 "10" at 166.147,46.762 h0.4 r270; Mechanical14 "11" at 166.147,45.492 h0.4 r270; Mechanical14 "F" at 158.108,59.881 h0.4 r270; Mechanical14 "E" at 159.378,59.881 h0.4 r270; Mechanical14 "D" at 160.648,59.881 h0.4 r270; Mechanical14 "G" at 156.838,59.881 h0.4 r270; Mechanical14 "C" at 161.918,59.881 h0.4 r270; Mechanical14 "B" at 163.188,59.881 h0.4 r270; Mechanical14 "A" at 164.458,59.881 h0.4 r270; Mechanical14 "H" at 155.568,59.881 h0.4 r270; Mechanical14 "I" at 154.298,59.806 h0.4 r270; Mechanical14 "J" at 153.003,59.935 h0.4 r270; Mechanical14 "K" at 151.733,59.935 h0.4 r270
J7: Top Overlay "1" at 205.05,93.575 h1.2 r270; Mechanical14 "1" at 205.05,93.575 h1.2 r270
J8: Mechanical8 "2.5mm" at 216.2,73.2 h1 r90; Mechanical8 "SLEEVE SHUNT" at 207.225,80.725 h0.5 r180; Mechanical8 "CENTER PIN" at 206.125,72.8 h0.5 r180
J9: Top Overlay "30" at 193.767,23.955 h1.02 r270; Mechanical14 "30" at 193.767,23.955 h1.02 r270
J13: Top Overlay "6" at 198.016,14.143 h1 r90; Top Overlay "5" at 198.016,12.143 h1 r90; Top Overlay "4" at 198.016,10.143 h1 r90; Top Overlay "3" at 198.016,8.143 h1 r90; Top Overlay "2" at 198.016,6.143 h1 r90; Top Overlay "1" at 198.016,4.143 h1 r90; Top Overlay "L" at 203.066,2.293 h1 r90; Top Overlay "K" at 204.466,2.293 h1 r90; Top Overlay "J" at 205.866,2.293 h1 r90; Top Overlay "I" at 207.266,2.543 h1 r90; Top Overlay "H" at 208.666,2.293 h1 r90; Top Overlay "G" at 210.066,2.293 h1 r90; Top Overlay "F" at 211.466,2.293 h1 r90; Top Overlay "E" at 212.866,2.293 h1 r90; Top Overlay "D" at 214.266,2.293 h1 r90; Top Overlay "C" at 215.666,1.293 h1 r90; Top Overlay "B" at 217.066,1.293 h1 r90; Top Overlay "A" at 218.466,1.293 h1 r90; DrillDrawing "Diam. 0.5mm +/-0.05" at 218.716,18.493 h1 r180; DrillDrawing "PRESS-FIT TECHNOLOGY" at 218.716,16.993 h1 r180; Mechanical14 "6" at 198.016,14.143 h1 r90; Mechanical14 "5" at 198.016,12.143 h1 r90; Mechanical14 "4" at 198.016,10.143 h1 r90; Mechanical14 "3" at 198.016,8.143 h1 r90; Mechanical14 "2" at 198.016,6.143 h1 r90; Mechanical14 "1" at 198.016,4.143 h1 r90; Mechanical14 "L" at 203.066,2.293 h1 r90; Mechanical14 "K" at 204.466,2.293 h1 r90; Mechanical14 "J" at 205.866,2.293 h1 r90; Mechanical14 "I" at 207.266,2.543 h1 r90; Mechanical14 "H" at 208.666,2.293 h1 r90; Mechanical14 "G" at 210.066,2.293 h1 r90; Mechanical14 "F" at 211.466,2.293 h1 r90; Mechanical14 "E" at 212.866,2.293 h1 r90; Mechanical14 "D" at 214.266,2.293 h1 r90; Mechanical14 "C" at 215.666,1.293 h1 r90; Mechanical14 "B" at 217.066,1.293 h1 r90; Mechanical14 "A" at 218.466,1.293 h1 r90; Mechanical8 "Edge of Daugher Card" at 220.816,6.268 h0.5 r90; Mechanical8 "Top Surface of Mother Board" at 232.316,5.118 h0.5 r90